# Altium PCB Copy of PCB1.PcbDoc (part 3 of 4)
Units mm, origin at the board's own origin, x right, y up, seen from the top; angles counter-clockwise.
Board outline 200 x 135 mm, 2 copper layers (Top Layer, Bottom Layer); 350 components, 150 nets, 843 pads, 244 vias.
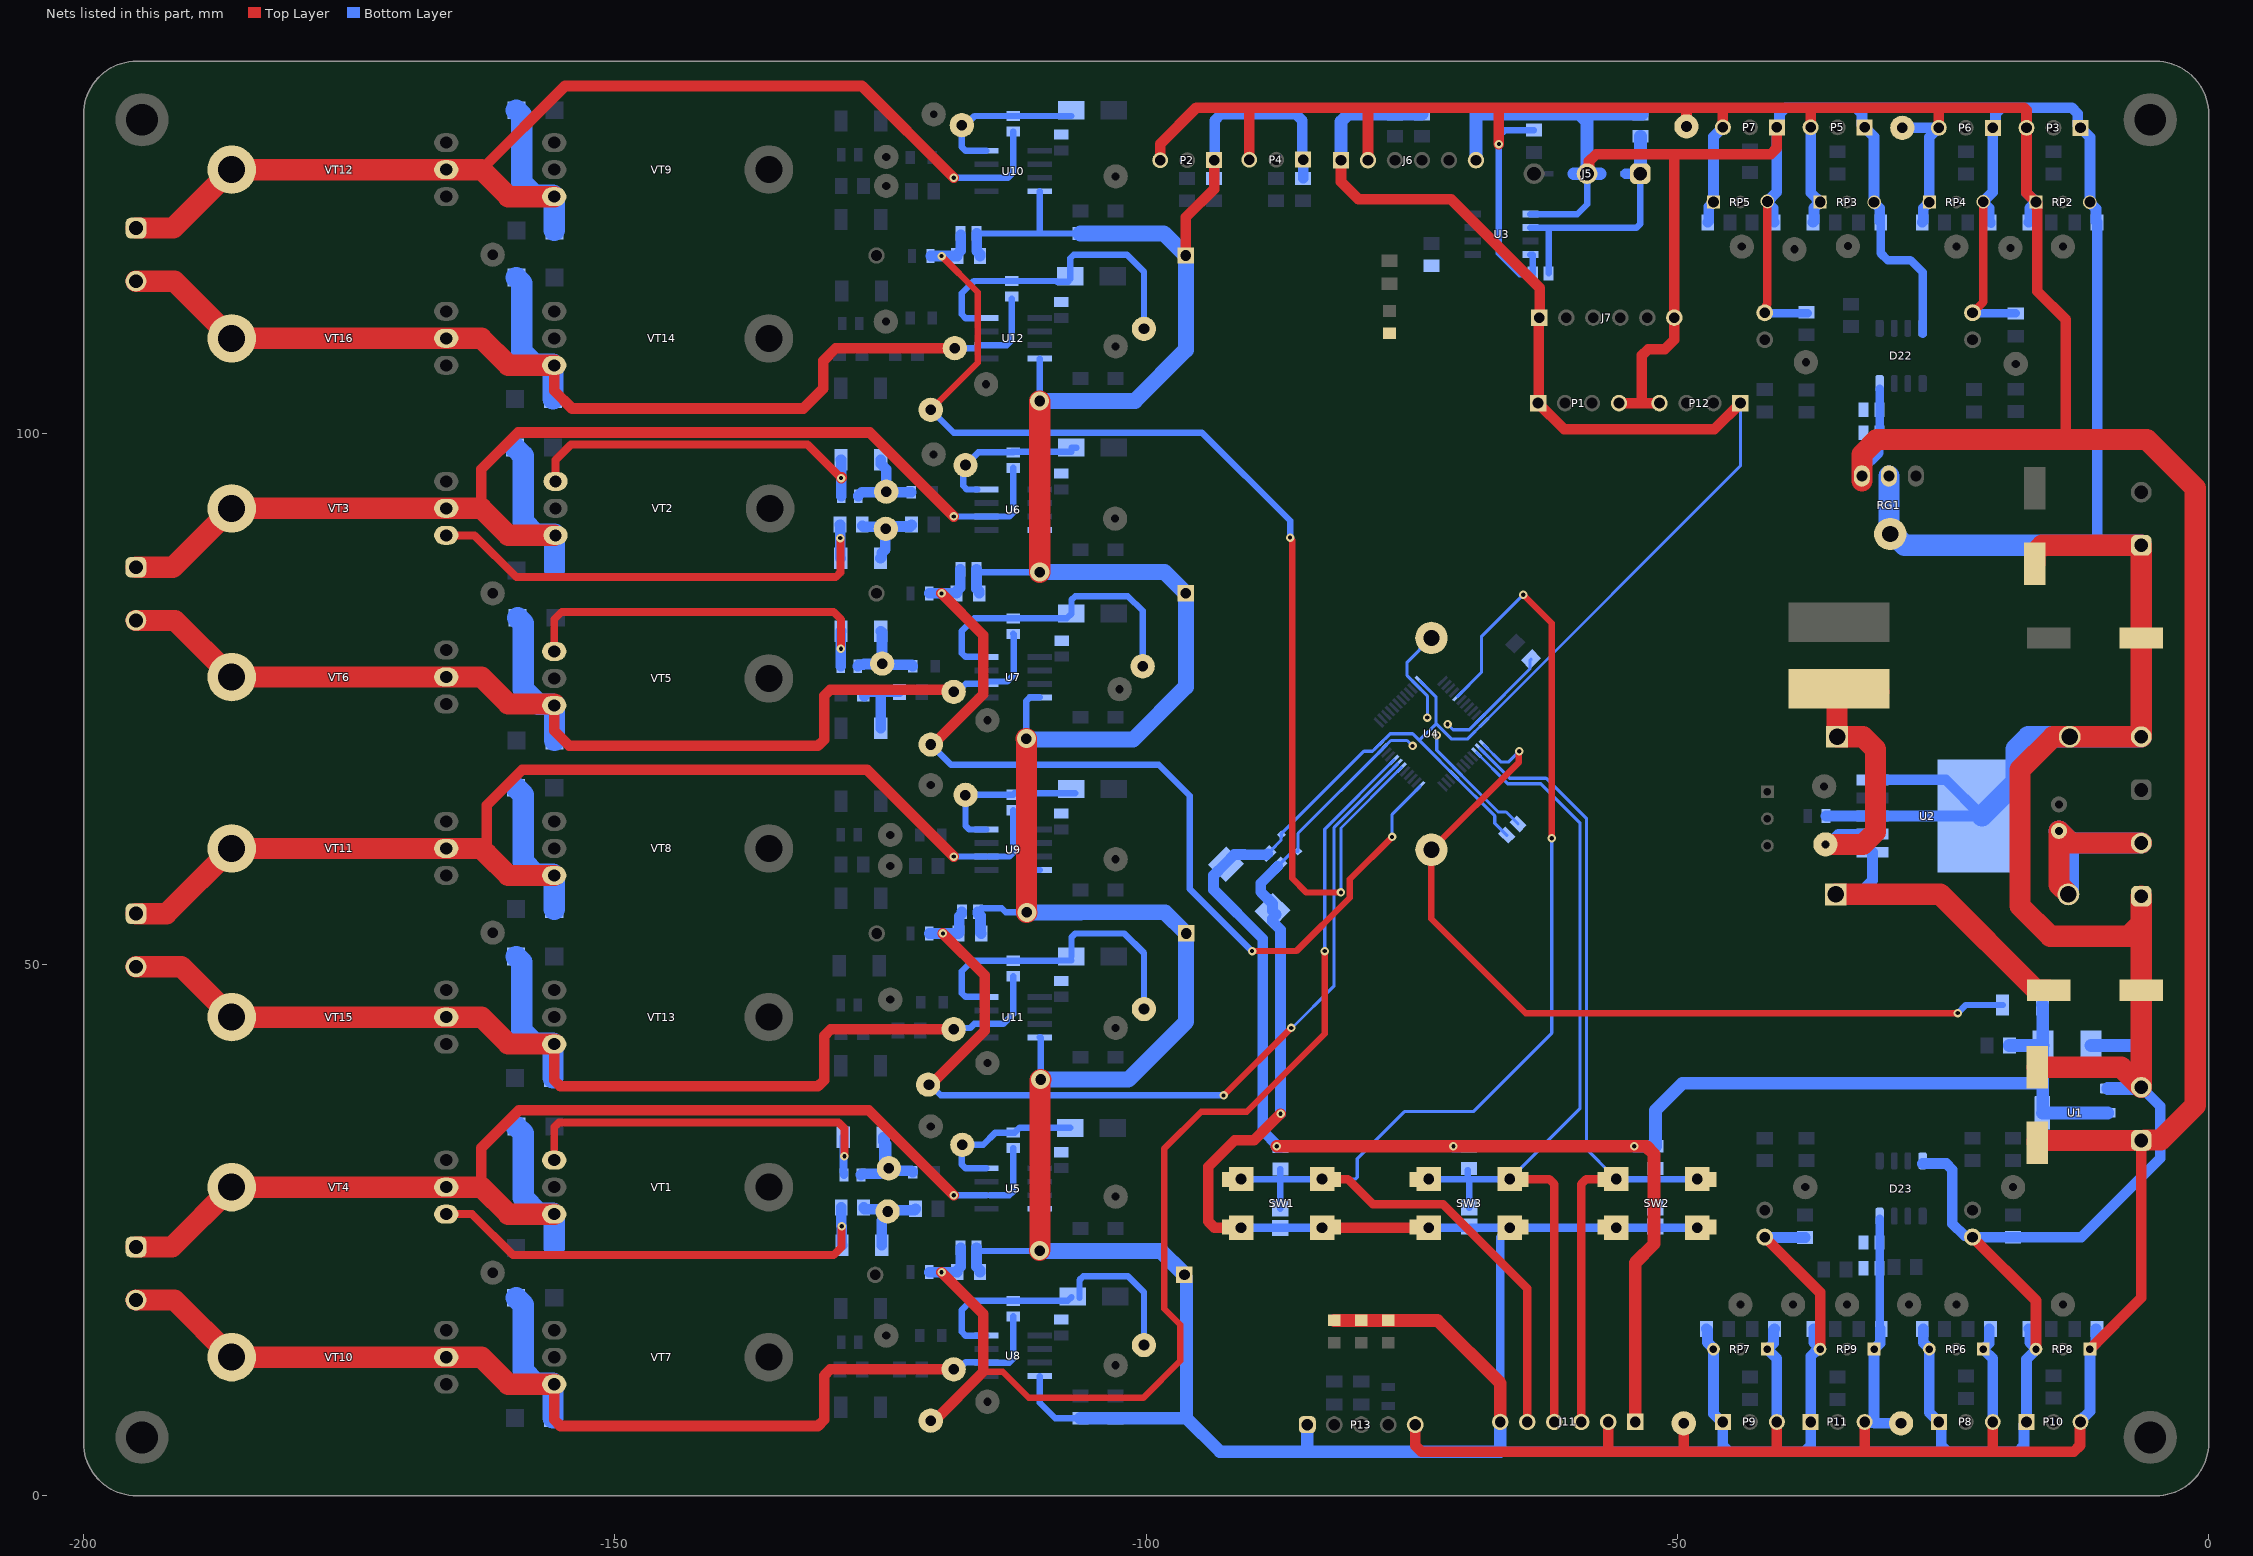
[diagram p2: the nets of this part, all layers, seen from the top]

## Via types
v1: diameter 0.8, hole 0.4, Top Layer to Bottom Layer, tented both sides, 119 vias
v2: diameter 1.27, hole 1, Top Layer to Bottom Layer, 115 vias
v3: diameter 1.8, hole 1, Top Layer to Bottom Layer, tented both sides, 6 vias
v4: diameter 1.27, hole 0.711, Top Layer to Bottom Layer, 3 vias
v5: diameter 0.8, hole 0.4, Top Layer to Bottom Layer, 1 vias

## Nets (pads, with @x,y where several pads share a name; then routed paths per layer and width w, separated by ;. In a path a pad name is that pad's centre, name@x,y a point inside that pad or via, vN(x,y) a via of type N, cw(c..) or ccw(c..) an arc to the next point about the centre after c; other vN are vias at no path point) (continued)
NetD8_1: (continued)
  Bottom Layer w1: R19.1@-127.127,78.065 -127.031,78.161 -127.031,78.196 -126.627,78.196 -126.541,78.281 -124.879,78.281 v2(-124.841,78.319) -124.855,78.333 -124.855,81.254 D8.1@-124.968,81.367 ; TP36.1@-124.766,78.319 -124.651,78.204 -122.043,78.204 -122.004,78.165 -122.004,78.115 R21.2@-121.954,78.065
NetD8_2: D8.2 R19.2 VT5.G | length 36.7
  Top Layer w0.75: VT5.G@-155.702,79.462 -155.702,82.48 -154.993,83.189 -129.433,83.189 -128.724,82.48 v1(-128.724,79.716)
  Bottom Layer w1: R19.2@-128.731,78.065 -128.724,78.071 v1(-128.724,79.716) -128.724,81.361 D8.2@-128.718,81.367
NetD9_1: D9.1 R26.1 R27.2 | length 6.9
  Bottom Layer w0.5: R27.2@-126.619,75.525 R27.2@-126.492,75.652
  Bottom Layer w1: R27.2@-126.516,75.271 R27.2@-126.516,75.652 ; R27.2@-126.492,75.652 -124.968,75.652 R26.1@-123.225,75.652 ; D9.1@-124.968,72.223 -124.968,75.271